# Altium PCB Atrium_Radio_Island.PcbDoc
Units mm, origin at the board's own origin, x right, y up, seen from the top; angles counter-clockwise.
Board outline 35.13 x 23.88 mm, 6 copper layers (Top Layer, Inner1, Inner2, Inner3, Inner4, Bottom Layer), stack 0.82 mm thick; 37 components, 30 nets, 150 pads, 117 vias.
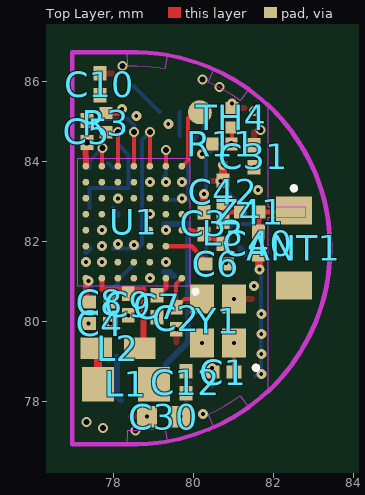
[diagram p0: Top Layer view]
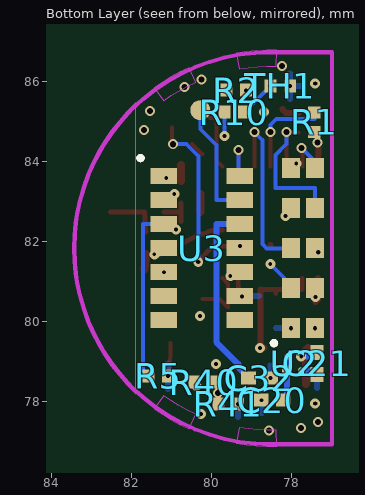
[diagram p1: Bottom Layer view, seen from below]
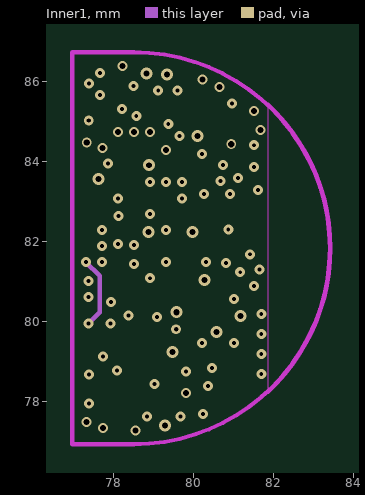
[diagram p2: Inner1]
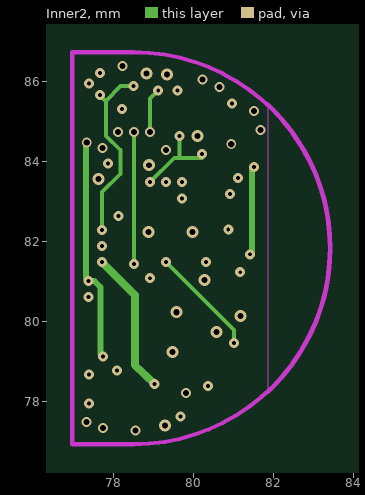
[diagram p3: Inner2]
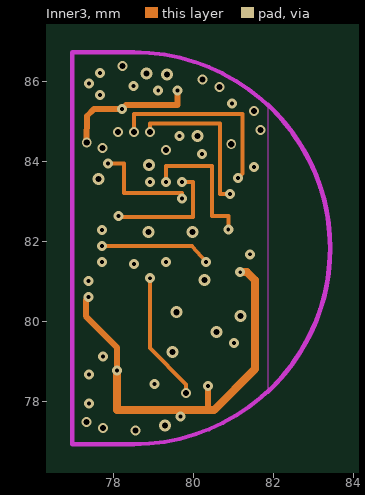
[diagram p4: Inner3]
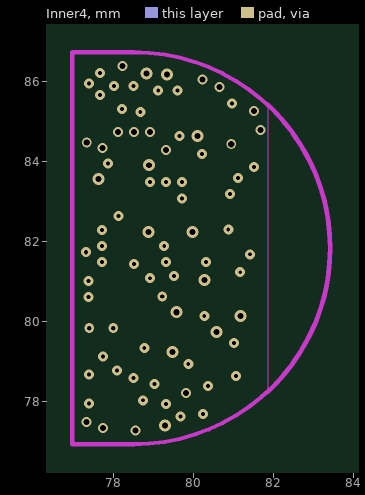
[diagram p5: Inner4]

## Layer stack, top to bottom
Top Solder Mask Layer: solder mask 0.012, Dk 3.8
Top Layer: signal copper 0.035
Dielectric1: surface 0.0964, 2313 PP, Dk 4.1
Inner1: signal copper 0.0152
Dielectric2: surface 0.15, Core 0.15, Dk 4.6
Inner2: signal copper 0.0152
Dielectric3: surface 0.1964, 2x2313 PP, Dk 4.1
Inner3: signal copper 0.0152
Dielectric4: surface 0.15, Core 0.15, Dk 4.6
Inner4: signal copper 0.0152
Dielectric5: surface 0.0964, 2313 PP, Dk 4.1
Bottom Layer: signal copper 0.035
Bottom Solder Mask Layer: solder mask 0.012, Dk 3.8

## Board outline
104.982,69.85 69.85,69.85 69.85,93.726 104.982,93.726

## Design rules (kind name [scope] priority, off if disabled: settings)
BoardOutlineClearance copperThickness1oz [All] p0: genericclearance=0.254 ignorepadtopadclearanceinfootprint=FALSE except(0: Arc-SplitContinuation Track-SplitContinuation SMDPad-SplitContinuation THPad-SplitContinuation Via-SplitContinuation Fill-SplitContinuation Poly-SplitContinuation Region-SplitContinuation Text-SplitContinuation)
BoardOutlineClearance copperThickness2oz [All] p0: genericclearance=0.254 ignorepadtopadclearanceinfootprint=FALSE except(0: Arc-SplitContinuation Track-SplitContinuation SMDPad-SplitContinuation THPad-SplitContinuation Via-SplitContinuation Fill-SplitContinuation Poly-SplitContinuation Region-SplitContinuation Text-SplitContinuation)
BoardOutlineClearance otherClearance [All] p0: genericclearance=0.254 ignorepadtopadclearanceinfootprint=FALSE except(0: Arc-SplitContinuation Track-SplitContinuation SMDPad-SplitContinuation THPad-SplitContinuation Via-SplitContinuation Fill-SplitContinuation Poly-SplitContinuation Region-SplitContinuation Text-SplitContinuation)
Clearance copperThickness1oz [All] p1: gap=0.178 ignorepadtopadclearanceinfootprint=FALSE
Clearance copperThickness2oz [All] p1: gap=0.178 ignorepadtopadclearanceinfootprint=FALSE
Clearance otherClearance [All] p1: gap=0.178 ignorepadtopadclearanceinfootprint=FALSE
DiffPairsRouting differentialPair [All] p1: maxuncoupledlength=10 minlimit=6 maxlimit=Infinity mostfreqgap=6 toplayer_minwidth=5 toplayer_prefwidth=10 toplayer_maxwidth=100 bottomlayer_minwidth=5 bottomlayer_prefwidth=10 bottomlayer_maxwidth=100 midlayer1_minwidth=5 midlayer1_prefwidth=10 midlayer1_maxwidth=100 midlayer2_minwidth=5 midlayer2_prefwidth=10 midlayer2_maxwidth=100 midlayer3_minwidth=5 midlayer3_prefwidth=10 midlayer3_maxwidth=100 midlayer4_minwidth=5 midlayer4_prefwidth=10 midlayer4_maxwidth=100
PasteMaskExpansion pasteMaskExpansion [All] p1: expansion=0
PlaneConnect innerPlane [All] p1: planeconnectstyle=Relief reliefexpansion=0.508 reliefentries=4 reliefconductorwidth=0.15 reliefairgap=0.15
PolygonConnect copperRegion [All] p1: connectstyle=Relief reliefentries=4 reliefconductorwidth=5.9055 polygonreliefangle="90 Angle" airgapwidth=5.9055
RoutingVias viaSize [All] p1: viastyle="Through Hole" holewidth=5.9056 minholewidth=5.9056 maxholewidth=248.0314 width=5.9056 minwidth=5.9056 maxwidth=248.0314
RoutingVias microVia [All] p1: viastyle="Through Hole" holewidth=3.937 minholewidth=3.937 maxholewidth=248.0314 width=3.937 minwidth=3.937 maxwidth=248.0314
RoutingVias buriedVia [All] p1: viastyle="Through Hole" holewidth=5.9056 minholewidth=5.9056 maxholewidth=248.0314 width=5.9056 minwidth=5.9056 maxwidth=248.0314
SolderMaskExpansion solderMaskExpansion [IsVia] p1: useseparateexpansions=TRUE expansion=-1000 expansionbottom=-1000
SolderMaskExpansion solderMaskExpansion [All] p2: useseparateexpansions=TRUE expansion=2 expansionbottom=2
Width copperThickness1oz [All] p1: maxlimit=100 minlimit=4 preferedwidth=4
Width copperThickness2oz [All] p1: maxlimit=100 minlimit=8 preferedwidth=10
Width RF_124 [All] p1: maxlimit=5 minlimit=5 preferedwidth=5
Width SW_200 [All] p1: maxlimit=39 minlimit=8 preferedwidth=10
Width PWR_150 [All] p1: maxlimit=39 minlimit=6 preferedwidth=8
Width DEC_150 [All] p1: maxlimit=20 minlimit=5 preferedwidth=6
Width SIG_100 [All] p1: maxlimit=10 minlimit=4 preferedwidth=4

## Components (designator, comment, footprint, x,y, rotation, side; value= is the part's Value field where it differs from the comment)
ANT1 "KH-1608-H08" ANT-SMD_L1.7-W0.9 82.519,81.827 r90 top
C1 "12pF" C0201 80.749,78.727 r180 top
C2 "12pF" C0201 79.579,80.077 r270 top
C3 "1pF" C0201 80.269,82.454 r90 top
C4 "100nF" C0201 77.663,79.947 r0 top
C5 "100nF" C0201 77.342,84.747 r90 top
C6 "100pF" C0201 80.569,81.437 r0 top
C7 "100pF" C0201 79.099,80.378 r270 top
C8 "4.7uF" C0201 77.668,80.477 r0 top
C9 "1uF" C0201 78.379,80.423 r270 top
C10 "10nF" C0201 77.669,85.927 r90 top
C12 "100nF" C0201 79.819,78.477 r90 top
C20 "1uF" C0201 78.469,78.027 r0 bottom
C21 "1uF" C0201 77.349,78.947 r270 bottom
C30 "10uF" C0402 79.269,77.617 r180 top
C31 "1uF" C0201 81.519,84.127 r90 top
C32 "1uF" C0201 78.789,78.577 r180 bottom
C40 "100pF" C0201 81.63,81.956 r270 top
C42 "100pF" C0201 80.749,83.238 r90 top
L1 "10uH" L0603 78.319,78.427 r180 top
L2 "15nH" L0402-R-RD 78.119,79.327 r0 top
L3 "3.3nH" L0201-RD 80.749,82.215 r90 top
R1 "4.7kΩ" R0201 77.419,84.977 r90 bottom
R2 "4.7kΩ" R0201 79.369,85.777 r180 bottom
R3 "100kΩ" R0201 77.818,84.967 r270 top
R5 "1MΩ" R0201 81.319,78.627 r180 bottom
R10 "10kΩ" R0201 79.419,85.227 r180 bottom
R11 "10kΩ" R0201 80.719,84.427 r0 top
R40 "2.2MΩ" R0201 80.169,78.477 r180 bottom
R41 "1MΩ" R0201 79.569,77.927 r180 bottom
TH1 "NCP03XH103F05RL" R0201 78.269,85.877 r180 bottom
TH4 "NCP03XH103F05RL" R0201 80.969,85.087 r90 top
U1 "NRF52832-CIAA-G-R7" WLCSP-50_L3.2-W3.0-TL_NRF52832 78.519,82.477 r180 top
U2 "TPS7A0218PYCHR" WLCSP-4_L0.6-W0.6-P0.35-R2-C2-TL 77.919,78.947 r180 bottom
U3 "MAXM86161AEFD+T" OLGA-14_L4.3-W2.9-P0.60-TL 80.229,81.827 r180 bottom
Y1 "-" CRYSTAL-SMD_4P-L1.6-W1.2-BL 80.619,80.007 r90 top
Z41 "0Ω" R0201 81.419,82.727 r0 top

## Footprints (in the part's own frame and the unit in brackets; to place one, negate y for a bottom-side part, rotate by r counter-clockwise, add the part's x,y. Pads: shape width x height; smd on the part's side, far side on the other; paste and mask are expansions set on the pad)
ANT-SMD_L1.7-W0.9 [mm]
  rect 0.7x0.9 smd paste+0 mask+0.051: 1(-0.937,0) 2(0.937,0)
  silkscreen extent 1.4,-0.1 1.6,0.1
C0201 [mm]
  rect 0.368x0.324 smd paste-100 mask+0.051: 1(-0.274,0) 2(0.274,0)
C0402 [mm]
  rect 0.5x0.54 smd paste+0 mask+0.051: 1(-0.42,0) 2(0.42,0)
CRYSTAL-SMD_4P-L1.6-W1.2-BL [mm]
  rect 0.73x0.6 smd paste+0 mask+0.05: 1(-0.55,-0.4) 2(0.55,-0.4) 3(0.55,0.4) 4(-0.55,0.4)
  silkscreen extent -1.27,-1.05 -1.07,-0.85
L0201-RD [mm]
  rect 0.368x0.324 smd paste-100 mask+0.051: 1(-0.274,0) 2(0.274,0)
L0402-R-RD [mm]
  rect 0.79x0.54 smd paste-100 mask+0.051: 1(-0.545,0) 2(0.545,0)
L0603 [mm]
  rect 0.8x0.864 smd paste-100 mask+0.051: 1(-0.7,0) 2(0.7,0)
OLGA-14_L4.3-W2.9-P0.60-TL [mm]
  rect 0.66x0.4 smd: 1(-0.95,1.8) 2(-0.95,1.2) 3(-0.95,0.6) 4(-0.95,0) 5(-0.95,-0.6) 6(-0.95,-1.2) 7(-0.95,-1.8) 8(0.95,-1.8) 9(0.95,-1.2) 10(0.95,-0.6) 11(0.95,0) 12(0.95,0.6) 13(0.95,1.2) 14(0.95,1.8)
  silkscreen extent -1.64,2.15 -1.43,2.36
R0201 [mm]
  rect 0.303x0.324 smd paste-100 mask+0.051: 1(-0.242,0) 2(0.242,0)
WLCSP-4_L0.6-W0.6-P0.35-R2-C2-TL [mm]
  round 0.158 smd paste-100 mask+0.05: A1(-0.175,0.175) A2(0.175,0.175) B1(-0.175,-0.175) B2(0.175,-0.175)
  silkscreen extent -0.61,0.41 -0.41,0.61
WLCSP-50_L3.2-W3.0-TL_NRF52832 [mm]
  round 0.17 smd paste-100 mask+0.051: A1(-1.2,1.4) A2(-0.8,1.4) A3(-0.4,1.4) A4(0,1.4) A5(0.4,1.4) A6(0.8,1.4) A7(1.2,1.4) B2(-0.8,1) B3(-0.4,1) B4(0,1) B5(0.4,1) B6(0.8,1) B7(1.2,1) C2(-0.8,0.6) C3(-0.4,0.6) C4(0,0.6) C5(0.4,0.6) C6(0.8,0.6) C7(1.2,0.6) D1(-1.2,0.2) D2(-0.8,0.2) D3(-0.4,0.2) D6(0.8,0.2) D7(1.2,0.2) E1(-1.2,-0.2) E2(-0.8,-0.2) E3(-0.4,-0.2) E6(0.8,-0.2) E7(1.2,-0.2) F1(-1.2,-0.6) F2(-0.8,-0.6) F3(-0.4,-0.6) F4(0,-0.6) F5(0.4,-0.6) F6(0.8,-0.6) F7(1.2,-0.6) G1(-1.2,-1) G2(-0.8,-1) G3(-0.4,-1) G4(0,-1) G5(0.4,-1) G6(0.8,-1) G7(1.2,-1) H1(-1.2,-1.4) H2(-0.8,-1.4) H3(-0.4,-1.4) H4(0,-1.4) H5(0.4,-1.4) H6(0.8,-1.4) H7(1.2,-1.4)
  silkscreen extent -1.64,1.64 -1.44,1.84

## Free pads (board coordinates)
  rect 0.45x0.5 smd far side: JR1(77.404,79.827) JR2(77.404,80.827) JR3(77.404,81.827) JR4(77.404,82.827) JR5(77.404,83.827) JR6(78.004,79.827) JR7(78.004,80.827) JR8(78.004,81.827)
  rect 0.45x0.5 smd far side paste+0 mask+0.051: JR9(78.003,82.827) JR10(78.003,83.828)
  round 0.599 smd: TP1(80.169,85.227)
  round 0.5 smd far side: TP2(80.269,85.277)

## Via types
v1: diameter 0.25, hole 0.099, Top Layer to Inner1, 22 vias
v2: diameter 0.25, hole 0.099, Inner1 to Bottom Layer, 15 vias
v3: diameter 0.25, hole 0.15, Top Layer to Bottom Layer, 14 vias
v4: diameter 0.25, hole 0.099, Top Layer to Inner4, 13 vias
v5: diameter 0.3, hole 0.15, Inner1 to Inner4, 12 vias
v6: diameter 0.249, hole 0.102, Top Layer to Inner1, 11 vias
v7: diameter 0.25, hole 0.099, Inner4 to Bottom Layer, 10 vias
v8: diameter 0.249, hole 0.102, Top Layer to Inner4, 6 vias
v9: diameter 0.249, hole 0.102, Inner4 to Bottom Layer, 6 vias
v10: diameter 0.249, hole 0.102, Inner1 to Bottom Layer, 5 vias
v11: diameter 0.249, hole 0.152, Top Layer to Bottom Layer, 2 vias
v12: diameter 0.3, hole 0.152, Inner1 to Inner4, 1 vias

## Nets (pads, with @x,y where several pads share a name; then routed paths per layer and width w, separated by ;. In a path a pad name is that pad's centre, name@x,y a point inside that pad or via, vN(x,y) a via of type N, cw(c..) or ccw(c..) an arc to the next point about the centre after c; other vN are vias at no path point)
ANT_FEED: ANT1.2 C40.1 Z41.2 | length 1.4
  Top Layer w0.124: C40.1 Z41.2 ANT1.2@82.52,82.728
ANT_NRF: C3.1 L3.1 U1.D1 | length 1.1
  Top Layer w0.124: U1.D1 79.898,82.278 cw(c79.898,81.906) 80.084,82.229 ccw(c80.269,82.551) C3.1 L3.1
CHG_PG: pad.JR4 R3.2 U1.H5 | length 4.2
  Top Layer w0.1: R3.2 78.116,84.724 v3(78.119,84.727) U1.H5
  Bottom Layer w0.1: pad.JR4 77.404,83.327 78.389,83.327 78.389,84.157 78.119,84.427 v3(78.119,84.727)
DCC: L1.1 U1.B6 | length 3.6
  Inner2 w0.2: v4(77.719,81.478) 78.544,80.653 78.544,78.902 v8(79.039,78.428)
DCC_L: L1.2 L2.1 | length 0.9
  Top Layer w0.2: L2.1 77.62,79.281 L1.2
DEC1: C4.1 U1.B7 | length 1.8
  Inner1 w0.12: v1(77.32,81.478) 77.664,81.134 77.664,80.222 v6(77.389,79.947)
DEC2: C7.1 U1.A2 | length 0.5
  Top Layer w0.12: C7.1 79.319,80.833 U1.A2
DEC3: C6.1 U1.C2 | length 1.2
  Top Layer w0.12: U1.C2 79.969,81.877 80.295,81.512 C6.1
DEC4: C9.1 L2.2 U1.A6 | length 2.9
  Top Layer w0.12: U1.A6 77.719,80.797 C9.1@78.379,80.797 ; C9.1 C9.1@78.379,80.797 ; 78.764,80.797 C9.1@78.379,80.797
  Top Layer w0.15: L2.2 78.764,79.427 78.764,80.797
GND: C1.2 C2.2 C3.2 C4.2 C5.2 C6.2 C7.2 C8.2 C9.2 C10.2 C12.2 C20.2 C21.2 C30.2 C31.2 C32.2 C40.2 C42.2 pad.JR1 pad.JR3 pad.JR6 R5.2 R41.2 TH1.2 TH4.2 U1.C4 U1.C5 U1.D2 U1.E3 U1.F5 U2.B2 U3.9 U3.10 U3.11 Y1.2 Y1.4 | length 2.1
  Top Layer w0.15: U1.C4 v1(78.519,81.907)
  Top Layer w0.2: C3.2 v1(80.269,83.177) ; C42.2 v1(80.749,83.913) ; C40.2 v1(81.661,81.291)
  Bottom Layer w0.15: v9(77.319,81.727) 77.404,81.812 pad.JR3 ; v10(77.395,78.674) 77.447,78.773 U2.B2 ; U3.10 79.419,81.227 v7(79.519,81.127)
  other v1: 81.704,78.677 79.819,78.75 80.475,78.827 81.704,79.177 81.704,79.677 78.379,80.15 81.704,80.177 81.519,80.877 78.118,81.937 79.319,82.278 78.918,82.677 78.118,83.076 81.619,83.277 80.689,83.513 81.519,84.402 79.379,84.927 78.579,85.127
  other v3: 78.555,77.266 77.748,77.333 77.329,77.477 81.679,84.777 81.525,85.258 80.661,85.852 80.24,86.05 78.229,86.377
  other v4: 80.97,85.449
  other v5: 79.3,77.392 79.479,79.227 80.579,79.727 81.179,80.127 80.279,81.027 78.879,82.227 79.979,82.227 77.639,83.562 78.895,83.901 80.109,84.627 79.354,86.165 78.83,86.196
  other v6: 78.849,77.617 80.249,77.687 80.218,79.456 79.578,79.802 77.937,79.947 79.099,80.104 77.942,80.477 81.018,80.558 80.819,81.457 77.391,85.021
  other v7: 79.327,77.927 78.742,78.026 81.077,78.628 79.879,78.927 78.779,79.327 80.279,80.127 79.279,81.886 78.679,85.227 78.026,85.877
  other v8: 77.668,86.202
  other v9: 80.249,77.687 78.514,78.577 77.404,79.827 78.003,79.827 79.229,80.617
  other v10: 77.395,77.942 77.395,85.947
  other v12: 79.589,80.227
I2C_SCL: pad.JR8 R2.2 U1.H3 U3.2 | length 9.9
  Top Layer w0.1: U1.H3 v3(78.919,84.727)
  Inner2 w0.1: v3(78.919,84.727) 78.919,85.566 v2(79.129,85.776)
  Inner3 w0.1: v3(78.919,84.727) 78.919,84.947 80.669,84.947 80.669,83.177 v2(80.919,83.177)
  Bottom Layer w0.1: pad.JR8 78.619,81.826 78.719,81.927 78.719,84.527 v3(78.919,84.727) ; v2(80.919,83.177) 81.068,83.027 U3.2
I2C_SDA: pad.JR7 R1.2 U1.H4 U3.1 | length 11.3
  Top Layer w0.1: U1.H4 v3(78.519,84.727)
  Inner2 w0.1: v2(78.519,81.427) v3(78.519,84.727)
  Inner3 w0.1: v3(78.519,84.727) 78.519,85.177 81.234,85.177 81.234,83.692 v2(81.119,83.577)
  Bottom Layer w0.1: R1.2 77.419,85.057 78.369,85.057 78.519,84.907 v3(78.519,84.727) ; pad.JR7 78.119,80.944 78.119,81.027 v2(78.519,81.427)
IMU_INT1: pad.JR5 U1.H6 | length 1.1
  Top Layer w0.1: U1.H6 77.719,84.307 v3(77.739,84.327)
  Bottom Layer w0.1: pad.JR5 77.404,83.992 v3(77.739,84.327)
NRESET_TP: pad.TP1 U1.H1 | length 1.6
  Top Layer w0.1: U1.H1 79.869,84.026 79.869,85.077 80.02,85.077 pad.TP1
NTC_EN: R10.1 R11.1 U1.G3 | length 3.1
  Top Layer w0.1: v4(80.219,84.177) 80.227,84.177 R11.1
  Inner2 w0.1: v4(78.918,83.477) 79.529,84.087 79.659,84.087 ; v2(79.659,84.627) 79.659,84.087 ; v4(80.219,84.177) 80.219,84.087 79.659,84.087
  Bottom Layer w0.1: v2(79.659,84.627) R10.1
PPG_GPIO: pad.TP2 U3.13 | length 3
  Bottom Layer w0.1: U3.13 79.869,83.027 79.869,84.403 80.269,84.802 pad.TP2
PPG_INT: U1.H2 U3.14 | length 1.1
  Top Layer w0.1: U1.H2 v3(79.319,84.277)
  Bottom Layer w0.1: U3.14 79.319,83.668 v3(79.319,84.277)
PPG_LDO_EN: R5.1 U1.G2 U3.3 | length 8.3
  Inner3 w0.1: v4(79.319,83.477) 79.319,83.877 80.469,83.877 80.469,82.627 80.879,82.627 v2(80.879,82.297)
  Bottom Layer w0.1: v2(80.879,82.297) 81.01,82.428 U3.3 81.699,82.428 81.699,78.768 R5.1
PPG_VLDO: C31.1 U3.4 | length 2.5
  Inner2 w0.15: v2(81.419,81.676) 81.469,81.726 81.469,83.803 v4(81.519,83.853)
  Bottom Layer w0.15: U3.4 81.328,81.676 v2(81.419,81.676)
PPG_VREF: C32.1 U3.12 | length 4.8
  Bottom Layer w0.15: C32.1 79.319,78.854 79.319,78.927 79.869,79.477 79.869,82.428 U3.12
RF_50R: C42.1 L3.2 Z41.1 | length 0.9
  Top Layer w0.124: L3.2 80.749,82.728 ; C42.1 80.749,82.728 ; Z41.1 80.749,82.728
SWDCLK: pad.JR10 U1.F1 | length 2.9
  Inner3 w0.1: v2(77.869,83.947) 78.269,83.947 78.269,83.202 79.718,83.202 v4(79.718,83.076)
  Bottom Layer w0.1: v2(77.869,83.947) 77.884,83.947 pad.JR10
SWDIO: pad.JR9 U1.G1 | length 3.3
  Inner3 w0.1: v2(78.139,82.627) 78.139,82.602 79.994,82.602 79.994,83.477 v4(79.718,83.477)
  Bottom Layer w0.1: pad.JR9 78.139,82.691 v2(78.139,82.627)
TH1_SENSE: C10.1 R10.2 TH1.1 U1.D6 | length 5.6
  Inner2 w0.1: v8(77.668,85.654) 77.815,85.507 77.819,85.507 ; v4(77.719,82.278) 77.719,83.227 78.179,83.687 78.179,84.277 77.819,84.637 77.819,85.507 ; v2(78.511,85.877) 78.189,85.877 77.819,85.507
  Bottom Layer w0.1: v2(78.511,85.877) 79.159,85.227 R10.2
TH4_SENSE: R11.2 TH4.1 U1.C6 | length 6.6
  Top Layer w0.1: v11(80.954,84.427) 80.97,84.437 TH4.1
  Inner3 w0.1: v4(77.719,81.877) 79.969,81.877 v10(80.319,81.487)
  Bottom Layer w0.1: v10(80.319,81.487) 80.319,84.127 80.619,84.427 v11(80.954,84.427)
VDD_1V8: C5.1 C8.1 C21.1 R1.1 R2.1 R3.1 U1.A7 U1.H7 U2.A2 | length 11.2
  Top Layer w0.15: U1.H7 77.313,84.445 v11(77.341,84.473) ; v8(77.389,81.008) U1.A7 77.32,80.551 C8.1 ; R3.1 78.123,85.207 v4(78.219,85.303)
  Inner2 w0.15: v11(77.341,84.473) 77.32,84.445 77.32,81.077 v8(77.389,81.008) 77.529,81.008 77.679,80.858 77.679,79.186 v2(77.744,79.121)
  Inner3 w0.15: v11(77.341,84.473) 77.348,85.132 77.519,85.303 v4(78.219,85.303) 78.323,85.407 79.611,85.407 v2(79.611,85.776)
  Bottom Layer w0.15: C21.1 77.45,79.121 77.47,79.121 v2(77.744,79.121)
VSYS: C20.1 C30.1 pad.JR2 R40.1 U2.A1 U2.B1 U3.5 | length 11.9
  Inner3 w0.15: v10(77.389,80.607) 77.319,80.537 77.319,80.127 78.095,79.351 v2(78.095,78.773) ; 80.369,77.777 v2(80.369,78.387)
  Inner3 w0.2: v2(78.095,78.773) 78.095,77.777 79.69,77.777 ; v8(79.69,77.617) 79.69,77.777 ; v2(81.178,81.227) 81.349,81.227 81.549,81.027 81.549,78.807 80.519,77.777 80.369,77.777 79.69,77.777
  Bottom Layer w0.15: U2.A1 v2(78.095,78.773) 78.095,78.125 C20.1
  Bottom Layer w0.2: v10(77.389,80.607) 77.404,80.622 pad.JR2
VSYS_SENSE: C12.1 R40.2 R41.1 U1.A3 | length 3.8
  Inner3 w0.1: v4(78.918,81.077) 78.918,79.327 79.819,78.425 v3(79.819,78.201)
  Bottom Layer w0.1: R41.1 79.819,77.937 79.819,78.367 R40.2
XC1: C1.1 U1.B2 Y1.1 | length 3.5
  Top Layer w0.1: v8(81.018,79.456) C1.1
  Inner2 w0.1: v4(79.319,81.478) 81.018,79.779 v8(81.018,79.456)
XC2: C2.1 U1.A1 Y1.3 | length 1.5
  Top Layer w0.1: U1.A1 79.578,80.937 C2.1 79.784,80.556 Y1.3
pads on no net: ANT1.1 U1.A4 U1.A5 U1.B3 U1.B4 U1.B5 U1.C3 U1.C7 U1.D3 U1.D7 U1.E1 U1.E2 U1.E6 U1.E7 U1.F2 U1.F3 U1.F4 U1.F6 U1.F7 U1.G4 U1.G5 U1.G6 U1.G7 U3.6 U3.7 U3.8

## Polygon pours and split planes (outlines as drawn)
GND on Inner1 (solid, remove dead copper): 76.2,87.376 76.2,76.2 84.074,76.2 84.074,87.376
GND on Inner4 (solid, remove dead copper): 76.2,87.376 76.2,76.2 84.074,76.2 84.074,87.376
GND on Top Layer (solid, remove dead copper, pour order 2): 76.2,87.376 76.2,76.2 84.074,76.2 84.074,87.376
GND on Bottom Layer (solid, remove dead copper, pour order 4): 76.2,87.376 76.2,76.2 84.074,76.2 84.074,87.376

## Keep-outs
Top Layer:
  region: 78.36,76.88 78.372,77.279 78.605,77.278 78.836,77.288 79.067,77.31 79.297,77.344 79.366,76.95 79.116,76.913 78.864,76.889 78.612,76.878 78.36,76.88
  region: 80.544,77.31 80.381,77.675 80.59,77.776 80.794,77.887 80.992,78.008 81.184,78.139 81.418,77.815 81.209,77.672 80.994,77.54 80.772,77.42 80.544,77.31
  region: 81.418,85.839 81.184,85.515 80.992,85.646 80.794,85.767 80.59,85.878 80.381,85.979 80.544,86.344 80.772,86.234 80.994,86.114 81.209,85.982 81.418,85.839
  region: 79.366,86.704 79.297,86.31 79.067,86.344 78.836,86.366 78.605,86.376 78.372,86.375 78.36,86.774 78.612,86.776 78.864,86.765 79.116,86.741 79.366,86.704
  region: 81.879,78.192 81.879,82.601 82.82,82.601 82.82,82.855 81.879,82.855 81.879,85.462 82.103,85.242 82.312,85.008 82.506,84.761 82.684,84.502 82.845,84.233 82.989,83.954 83.115,83.666 83.222,83.371 83.31,83.07 83.38,82.763 83.429,82.453 83.459,82.141 83.469,81.827 83.459,81.513 83.429,81.201 83.38,80.891 83.31,80.584 83.222,80.283 83.115,79.988 82.989,79.7 82.845,79.421 82.684,79.152 82.506,78.893 82.312,78.646 82.103,78.412 81.879,78.192
  region: 77.119,80.877 77.119,84.077 79.919,84.077 79.919,80.877
Inner1:
  region: 81.879,78.192 81.879,85.462 82.103,85.242 82.312,85.008 82.506,84.761 82.684,84.502 82.845,84.233 82.989,83.954 83.115,83.666 83.222,83.371 83.31,83.07 83.38,82.763 83.429,82.453 83.459,82.141 83.469,81.827 83.459,81.513 83.429,81.201 83.38,80.891 83.31,80.584 83.222,80.283 83.115,79.988 82.989,79.7 82.845,79.421 82.684,79.152 82.506,78.893 82.312,78.646 82.103,78.412 81.879,78.192
Inner2:
  region: 81.879,78.192 81.879,85.462 82.103,85.242 82.312,85.008 82.506,84.761 82.684,84.502 82.845,84.233 82.989,83.954 83.115,83.666 83.222,83.371 83.31,83.07 83.38,82.763 83.429,82.453 83.459,82.141 83.469,81.827 83.459,81.513 83.429,81.201 83.38,80.891 83.31,80.584 83.222,80.283 83.115,79.988 82.989,79.7 82.845,79.421 82.684,79.152 82.506,78.893 82.312,78.646 82.103,78.412 81.879,78.192
Inner3:
  region: 81.879,78.192 81.879,85.462 82.103,85.242 82.312,85.008 82.506,84.761 82.684,84.502 82.845,84.233 82.989,83.954 83.115,83.666 83.222,83.371 83.31,83.07 83.38,82.763 83.429,82.453 83.459,82.141 83.469,81.827 83.459,81.513 83.429,81.201 83.38,80.891 83.31,80.584 83.222,80.283 83.115,79.988 82.989,79.7 82.845,79.421 82.684,79.152 82.506,78.893 82.312,78.646 82.103,78.412 81.879,78.192
Inner4:
  region: 81.879,78.192 81.879,85.462 82.103,85.242 82.312,85.008 82.506,84.761 82.684,84.502 82.845,84.233 82.989,83.954 83.115,83.666 83.222,83.371 83.31,83.07 83.38,82.763 83.429,82.453 83.459,82.141 83.469,81.827 83.459,81.513 83.429,81.201 83.38,80.891 83.31,80.584 83.222,80.283 83.115,79.988 82.989,79.7 82.845,79.421 82.684,79.152 82.506,78.893 82.312,78.646 82.103,78.412 81.879,78.192
Bottom Layer:
  region: 78.36,76.88 78.372,77.279 78.605,77.278 78.836,77.288 79.067,77.31 79.297,77.344 79.366,76.95 79.116,76.913 78.864,76.889 78.612,76.878 78.36,76.88
  region: 80.544,77.31 80.381,77.675 80.59,77.776 80.794,77.887 80.992,78.008 81.184,78.139 81.418,77.815 81.209,77.672 80.994,77.54 80.772,77.42 80.544,77.31
  region: 81.418,85.839 81.184,85.515 80.992,85.646 80.794,85.767 80.59,85.878 80.381,85.979 80.544,86.344 80.772,86.234 80.994,86.114 81.209,85.982 81.418,85.839
  region: 79.366,86.704 79.297,86.31 79.067,86.344 78.836,86.366 78.605,86.376 78.372,86.375 78.36,86.774 78.612,86.776 78.864,86.765 79.116,86.741 79.366,86.704
  region: 81.879,78.192 81.879,85.462 82.103,85.242 82.312,85.008 82.506,84.761 82.684,84.502 82.845,84.233 82.989,83.954 83.115,83.666 83.222,83.371 83.31,83.07 83.38,82.763 83.429,82.453 83.459,82.141 83.469,81.827 83.459,81.513 83.429,81.201 83.38,80.891 83.31,80.584 83.222,80.283 83.115,79.988 82.989,79.7 82.845,79.421 82.684,79.152 82.506,78.893 82.312,78.646 82.103,78.412 81.879,78.192
Board Outline Layer:
  lines w0.102: 76.979,76.927 76.979,86.727 78.519,86.727 cw(c78.519,81.827) 78.519,76.927 76.979,76.927

## Silkscreen, mask and mechanical layers (free items; w line width, h text height)
Top Solder Mask Layer:
  region: 78.434,77.278 78.496,77.277 78.558,77.277 78.62,77.278 78.682,77.28 78.744,77.283 78.806,77.286 78.867,77.29 78.929,77.296 78.991,77.301 79.052,77.308 79.114,77.316 79.175,77.325 79.236,77.334 79.297,77.344 79.366,76.95 79.299,76.939 79.232,76.929 79.166,76.919 79.099,76.911 79.032,76.904 78.965,76.897 78.898,76.892 78.831,76.887 78.763,76.883 78.696,76.88 78.629,76.878 78.562,76.877 78.494,76.877 78.427,76.878 78.36,76.88 78.372,77.279
  region: 80.437,77.701 80.493,77.728 80.549,77.755 80.604,77.783 80.659,77.812 80.713,77.841 80.767,77.871 80.821,77.902 80.874,77.934 80.927,77.966 80.979,77.999 81.031,78.033 81.082,78.068 81.133,78.103 81.184,78.139 81.418,77.815 81.363,77.776 81.308,77.737 81.252,77.7 81.195,77.663 81.138,77.627 81.081,77.592 81.023,77.557 80.965,77.523 80.906,77.491 80.847,77.458 80.787,77.427 80.727,77.397 80.667,77.367 80.606,77.338 80.544,77.31 80.381,77.675
  region: 81.133,85.551 81.082,85.586 81.031,85.621 80.979,85.655 80.927,85.688 80.874,85.72 80.821,85.752 80.767,85.783 80.713,85.813 80.659,85.843 80.604,85.871 80.549,85.899 80.493,85.926 80.437,85.953 80.381,85.979 80.544,86.344 80.606,86.316 80.667,86.287 80.727,86.257 80.787,86.227 80.847,86.196 80.906,86.163 80.965,86.131 81.023,86.097 81.081,86.062 81.138,86.027 81.195,85.991 81.252,85.954 81.308,85.917 81.363,85.878 81.418,85.839 81.184,85.515
  region: 79.236,86.32 79.175,86.329 79.114,86.338 79.052,86.346 78.991,86.353 78.929,86.359 78.867,86.364 78.806,86.368 78.744,86.371 78.682,86.374 78.62,86.376 78.558,86.377 78.496,86.377 78.434,86.376 78.372,86.375 78.36,86.774 78.427,86.776 78.494,86.777 78.562,86.777 78.629,86.776 78.696,86.774 78.763,86.771 78.831,86.767 78.898,86.762 78.965,86.757 79.032,86.75 79.099,86.743 79.166,86.735 79.232,86.725 79.299,86.715 79.366,86.704 79.297,86.31
Bottom Solder Mask Layer:
  region: 78.434,77.278 78.496,77.277 78.558,77.277 78.62,77.278 78.682,77.28 78.744,77.283 78.806,77.286 78.867,77.29 78.929,77.296 78.991,77.301 79.052,77.308 79.114,77.316 79.175,77.325 79.236,77.334 79.297,77.344 79.366,76.95 79.299,76.939 79.232,76.929 79.166,76.919 79.099,76.911 79.032,76.904 78.965,76.897 78.898,76.892 78.831,76.887 78.763,76.883 78.696,76.88 78.629,76.878 78.562,76.877 78.494,76.877 78.427,76.878 78.36,76.88 78.372,77.279
  region: 80.437,77.701 80.493,77.728 80.549,77.755 80.604,77.783 80.659,77.812 80.713,77.841 80.767,77.871 80.821,77.902 80.874,77.934 80.927,77.966 80.979,77.999 81.031,78.033 81.082,78.068 81.133,78.103 81.184,78.139 81.418,77.815 81.363,77.776 81.308,77.737 81.252,77.7 81.195,77.663 81.138,77.627 81.081,77.592 81.023,77.557 80.965,77.523 80.906,77.491 80.847,77.458 80.787,77.427 80.727,77.397 80.667,77.367 80.606,77.338 80.544,77.31 80.381,77.675
  region: 81.133,85.551 81.082,85.586 81.031,85.621 80.979,85.655 80.927,85.688 80.874,85.72 80.821,85.752 80.767,85.783 80.713,85.813 80.659,85.843 80.604,85.871 80.549,85.899 80.493,85.926 80.437,85.953 80.381,85.979 80.544,86.344 80.606,86.316 80.667,86.287 80.727,86.257 80.787,86.227 80.847,86.196 80.906,86.163 80.965,86.131 81.023,86.097 81.081,86.062 81.138,86.027 81.195,85.991 81.252,85.954 81.308,85.917 81.363,85.878 81.418,85.839 81.184,85.515
  region: 79.236,86.32 79.175,86.329 79.114,86.338 79.052,86.346 78.991,86.353 78.929,86.359 78.867,86.364 78.806,86.368 78.744,86.371 78.682,86.374 78.62,86.376 78.558,86.377 78.496,86.377 78.434,86.376 78.372,86.375 78.36,86.774 78.427,86.776 78.494,86.777 78.562,86.777 78.629,86.776 78.696,86.774 78.763,86.771 78.831,86.767 78.898,86.762 78.965,86.757 79.032,86.75 79.099,86.743 79.166,86.735 79.232,86.725 79.299,86.715 79.366,86.704 79.297,86.31
Document Layer:
  text "LAYOUT NOTES - RADIO ISLAND (EVT)  6L HDI 1+4+1, 0.82 mm, JLC06081H-2313, ENIG, vias filled + capped" at 84.319,86.727 h0.23
  text "Stack: L1 signal + RF + GND pour | L2 solid GND | L3 signal | L4 signal | L5 solid GND | L6 signal + bottom parts + GND pour" at 84.319,86.407 h0.18
  text "RF: ANT(D1) > C3 1.0pF shunt > L3 3.3nH > 50R CPWG on L1, 0.124 w / 0.127 gap, L2 ref (2313 prepreg 0.0964, sim 52.7 R) > pi C42/Z41/C40 > ANT1" at 84.319,86.087 h0.18
  text "RF: ARC bends r >= 3w, no vias in the line, no stubs; GND fence microvias (L1-L2) both sides <= 1 mm; tune the pi on a VNA" at 84.319,85.767 h0.18
  text "Antenna zone x >= 18.76 mm: no copper on L2-L6 (full regions); L1 notched only for the feed to ANT1 (ANT1 pin 1 unconnected). Via fence along its edge" at 84.319,85.447 h0.18
  text "U1: copy Nordic CIAA DC/DC reference. DEC caps at their balls; DCC>L1>L2>DEC4 loop smallest, away from RF and Y1" at 84.319,85.127 h0.18
  text "Y1 NX1612SA 1.88 mm from XC1/XC2. No vias in XC traces, GND ring, nothing switching under" at 84.319,84.807 h0.18
  text "U3 MAXM86161 (bottom): microvias L4-L3 + buried vias for PGND / GND_DIG / GND_ANA; C30 (VLED) with its own via" at 84.319,84.487 h0.18
  text "Vias: laser L1-L2 / L5-L6 0.10/0.25 filled in ball pads; buried L2-L5 0.15/0.30; stacked skip L1-L5 / L2-L6 0.10/0.25; through 0.15/0.25. No through via under U1" at 84.319,84.167 h0.18
  text "Purple bands = board clamps: no parts on either side. Copper >= 0.2 mm from the edge" at 84.319,83.847 h0.18
  text "L2-L5 GND ties around the perimeter (target <= 1.0 mm, max gap 2.4 mm < lambda/20). Placement: hardware/placement/placement_20p9.json" at 84.319,83.527 h0.18